# Altium PCB MeadowMinimum.PcbDoc
Units mil, origin at the board's own origin, x right, y up, seen from the top; angles counter-clockwise.
Board outline 2086.61 x 3070.87 mil, 4 copper layers (1:Top Layer, 2:Power, 3:GND, 4:Bottom Layer), stack 62.36 mil thick; 107 components, 134 nets, 497 pads, 224 vias.
Unrouted connection lines stored in the file: 1.
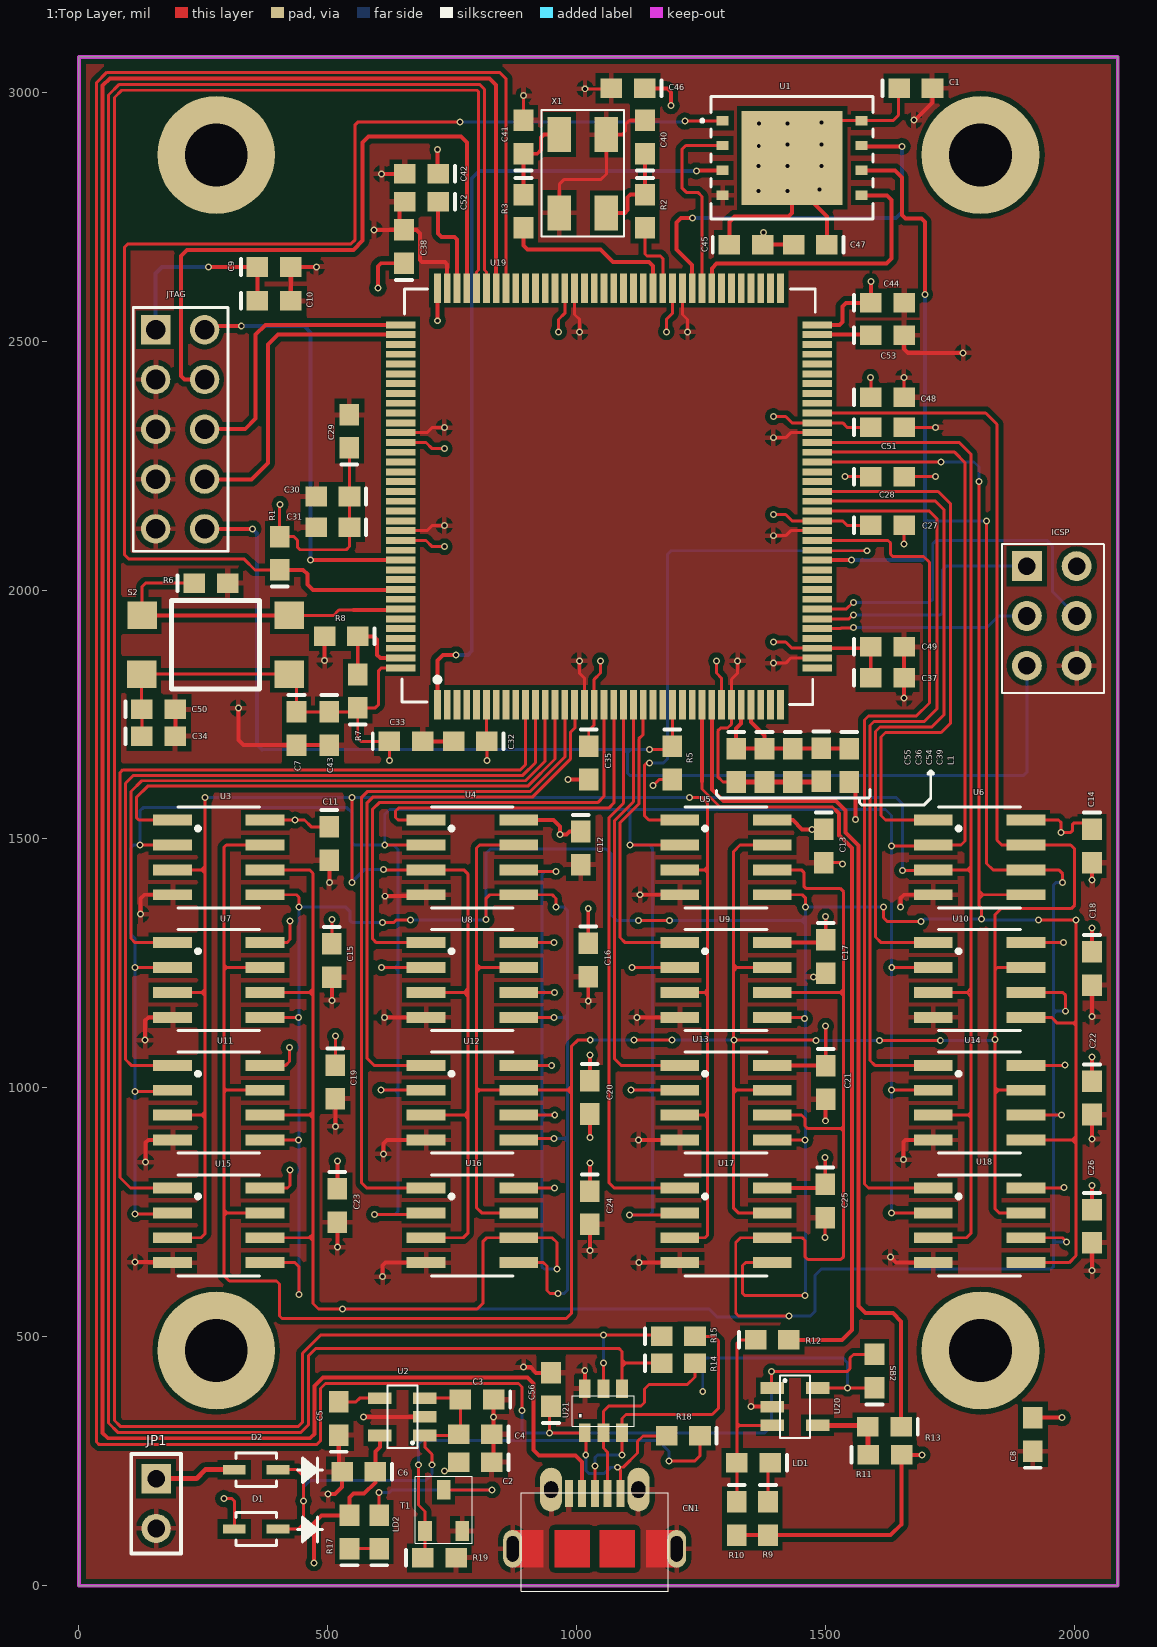
[diagram p0: 1:Top Layer view]
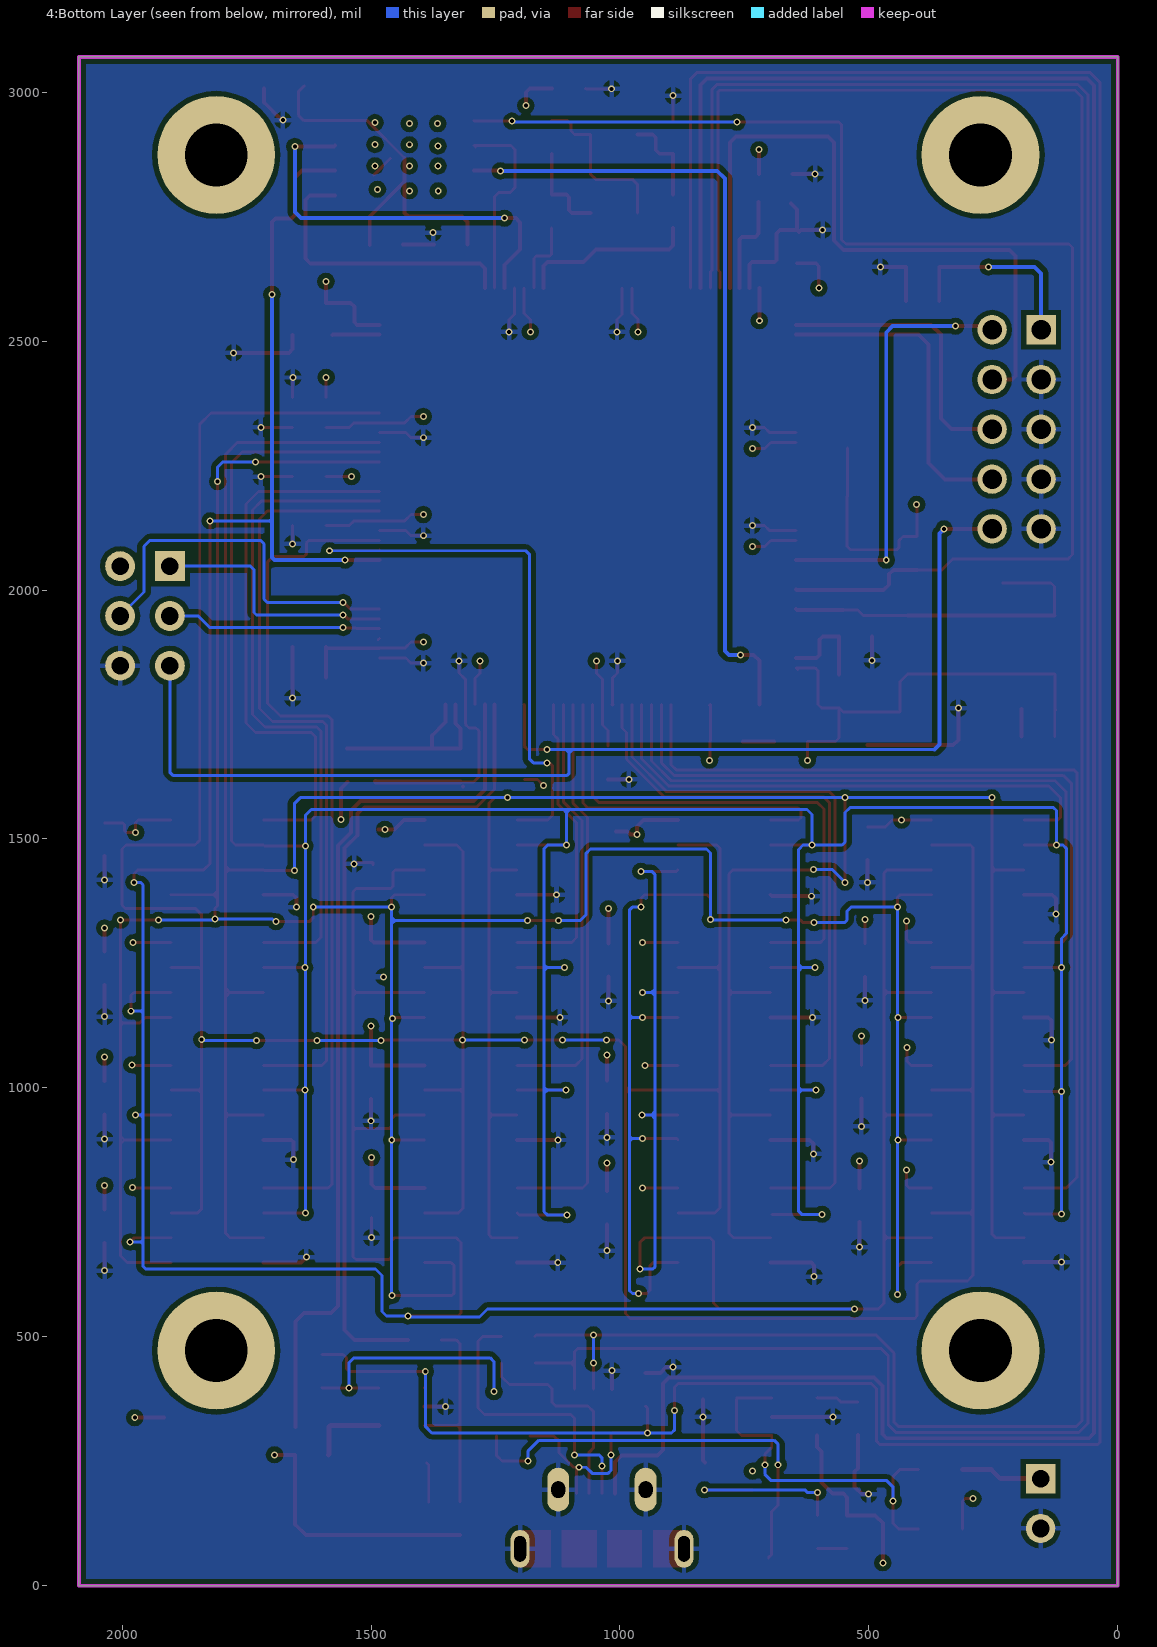
[diagram p1: 4:Bottom Layer view, seen from below]
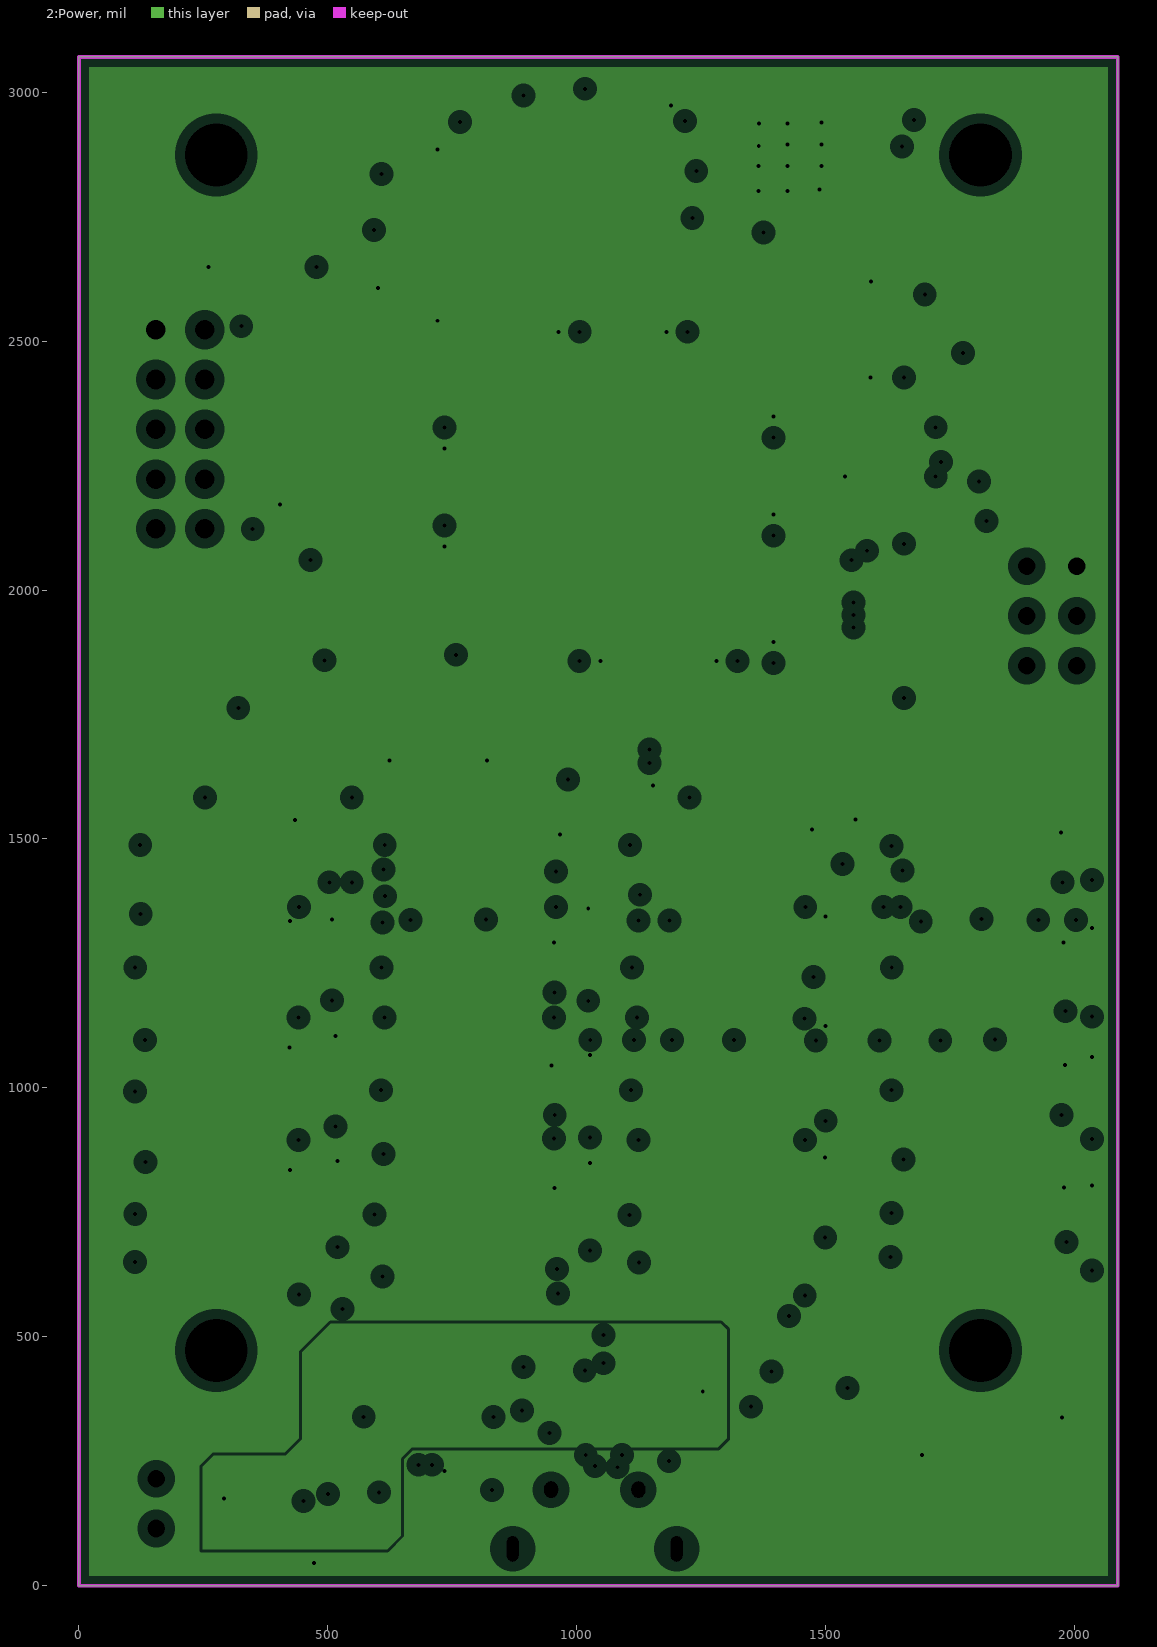
[diagram p2: 2:Power, clearances drawn from the general rule]
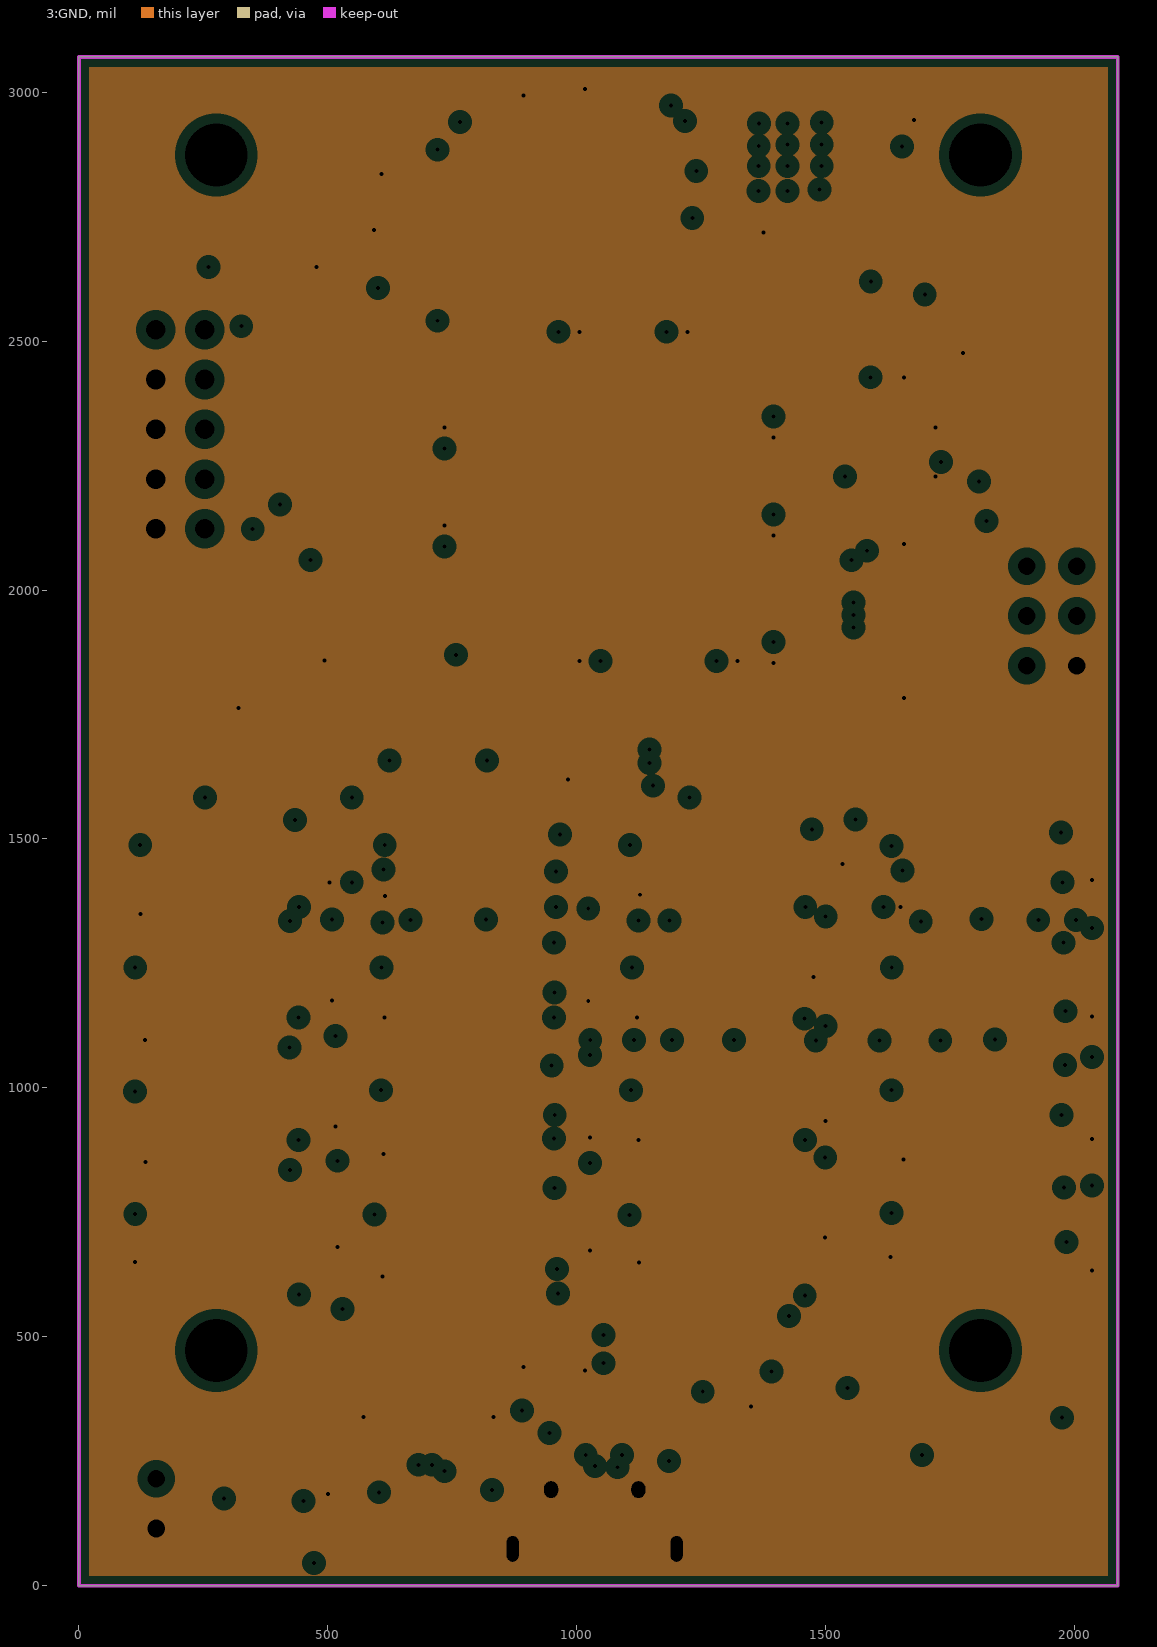
[diagram p3: 3:GND, clearances drawn from the general rule]

## Layer stack, top to bottom
Top Solder: solder mask 0.4, Solder Resist, Dk 3.5
1:Top Layer: signal copper 1.4169
Dielectric 1: core 18.8976, FR-4, Dk 4.2
2:Power: plane copper 1.4169, net (Multiple Nets)
Dielectric 2: prepreg 18.8976, FR-4, Dk 4.2
3:GND: plane copper 1.4169, net GND
Dielectric 3: core 18.8976, FR-4, Dk 4.2
4:Bottom Layer: signal copper 1.4169
Bottom Solder: solder mask 0.4, Solder Resist, Dk 3.5

## Board outline
0,0 2086.61,0 2086.61,3070.87 0,3070.87

## Design rules (kind name [scope] priority, off if disabled: settings)
Clearance Clearance_1 [All vs inpoly] p1: gap=10
Clearance [All] p2: gap=5
ComponentClearance [All] p1: gap=6 collisioncheckmode=3 verticalgap=6 showdistances=FALSE
DiffPairsRouting [All] p1: maxlimit=6 minlimit=6 mostfreqgap=6 toplayer_minwidth=6 toplayer_maxwidth=6 toplayer_prefwidth=6 bottomlayer_minwidth=6 bottomlayer_maxwidth=6 bottomlayer_prefwidth=6 maxuncoupledlength=500
HoleSize [All] p1: absolutevalues=TRUE maxlimit=1000 minlimit=1 maxpercent=80.000 minpercent=20.000
HoleToHoleClearance [All] p1: gap=8 allowstackedmicrovias=TRUE
MinimumSolderMaskSliver [All] p1: minsoldermaskwidth=2
PlaneClearance [All] p1: clearance=20
PlaneConnect [All] p1: planeconnectstyle=Relief reliefexpansion=20 reliefentries=4 reliefconductorwidth=10 reliefairgap=10
PolygonConnect [All] p1: connectstyle=Relief reliefconductorwidth=10 reliefentries=4 polygonreliefangle="90 Angle" airgapwidth=10
RoutingVias [All] p1: holewidth=23.62 width=39.37 viastyle="Through Hole" minholewidth=8 minwidth=8 maxholewidth=50 maxwidth=50
SilkToSilkClearance [All] p1: silktosilkclearance=1
SilkToSolderMaskClearance [IsPad] p1: minsilkscreentomaskgap=0 clearancetoexposedcopper=TRUE
SolderMaskExpansion [All] p1: expansion=4
Width [All] p1: maxlimit=80 minlimit=6 preferedwidth=6
21 further rules are at their usual default settings.

## Classes and differential pairs
component class "FLASH QSPI": C1 R1 U1
component class Power: C2 C3 C4 C5 C6 C7 C8 C9 C10 D1 D2 JP1 U2
component class SRAM: C11 C12 C13 C14 C15 C16 C17 C18 C19 C20 C21 C22 C23 C24 C25 C26 U3 U4 U5 U6 U7 U8 U9 U10 U11 U12 U13 U14 U15 U16 U17 U18
component class STM32F7: C27 C28 C29 C30 C31 C32 C33 C34 C35 C36 C37 C38 C39 C40 C41 C42 C43 C44 C45 C46 C47 C48 C49 C50 C51 C52 C53 C54 C55 ICSP JTAG L1 R2 R3 R5 R6 R7 R8 S2 U19 X1
component class USB_OTG_FS: C56 CN1 LD1 LD2 R9 R10 R11 R12 R13 R14 R15 R17 R18 R19 SB2 T1 U20 U21
differential pair OTG_FS: +OTG_FS_P -OTG_FS_N
differential pair USB_FS1: +USB_FS1_P -USB_FS1_N

## Components (designator, comment, footprint, x,y, rotation, side; value= is the part's Value field where it differs from the comment)
C1 "100nF" 0603 1681,3008 r0 top
C2 "100nF" 0603 796,248 r180 top
C3 "1uF" 0603 799.45,374 r180 top
C4 "100nF" 0603 796,304 r180 top
C5 "10nF" 0603 522,336 r90 top
C6 "1uF" 0603 562,229 r180 top
C7 "100nF" 0603 437,1722 r270 top
C8 "100nF" 0603 1916,304 r90 top
C9 "100nF" 0603 392,2649 r0 top
C10 "100nF" 0603 392,2581 r0 top
C11 "100nF" 0603 502.84,1491 r270 top
C12 "100nF" 0603 1008,1481.62 r270 top
C13 "100nF" 0603 1496,1486 r270 top
C14 "100nF" 0603 2035,1486 r270 top
C15 "100nF" 0603 508,1256 r270 top
C16 "100nF" 0603 1023,1257 r270 top
C17 "100nF" 0603 1500,1264 r270 top
C18 "100nF" 0603 2035,1240 r270 top
C19 "100nF" 0603 515,1012 r270 top
C20 "100nF" 0603 1026.25,981 r270 top
C21 "100nF" 0603 1500,1011 r270 top
C22 "100nF" 0603 2035,980 r270 top
C23 "100nF" 0603 519,764 r270 top
C24 "100nF" 0603 1026.25,759.26 r270 top
C25 "100nF" 0603 1499,773 r270 top
C26 "100nF" 0603 2035,722 r270 top
C27 "100nF" 0603 1624,2130 r0 top
C28 "100nF" 0603 1624,2228 r0 top
C29 "100nF" 0603 543,2319 r90 top
C30 "100nF" 0603 510,2188 r180 top
C31 "100nF" 0603 510,2126 r180 top
C32 "100nF" 0603 786,1696 r180 top
C33 "100nF" 0603 657,1696 r0 top
C34 "100nF" 0603 160,1706 r0 top
C35 "100nF" 0603 1024,1653 r270 top
C36 "100nF" 0603 1377,1648 r270 top
C37 "4.7uF" 0603 1624,1824 r0 top
C38 "4.7uF" 0603 653,2690 r90 top
C39 "1uF" 0603 1491,1649.17 r270 top
C40 "4.7pF" 0603 1137,2910 r90 top
C41 "4.7pF" 0603 893,2910 r90 top
C42 "100nF" 0603 688,2836 r180 top
C43 "100nF" 0603 503,1722 r270 top
C44 "100nF" 0603 1624,2577 r0 top
C45 "100nF" 0603 1340,2694 r0 top
C46 "100nF" 0603 1103,3008 r180 top
C47 "100nF" 0603 1469,2694 r180 top
C48 "100nF" 0603 1624,2387 r0 top
C49 "100nF" 0603 1624,1886 r0 top
C50 "100nF" 0603 160,1761 r0 top
C51 "100nF" 0603 1624,2327 r0 top
C52 "2.2uF" 0603 688,2780 r180 top
C53 "2.2uF" 0603 1624,2512 r0 top
C54 "100nF" 0603 1434,1648 r270 top
C55 "1uF" 0603 1320,1648 r270 top
C56 "4.7uF" 0603 948.25,394 r90 top
CN1 "USB-MICRO-AB" "USB-MICRO-AB, 47590-0001, SMT, MOLEX" 984.25,185 r0 top
D1 "BAT60JFILM" BAT60JFILM 438,85 r0 top
D2 "BAT60JFILM" BAT60JFILM 438,204 r0 top
ICSP "Header3x2" "6 pin Header" 1904,2048 r0 top
JP1 "Header 2" HDR1X2 155,215 r270 top
JTAG "Header 5X2" "10 Pin Header" 154,2523 r0 top
L1 "BLM18EG601SN1D" 0603 1547,1648 r270 top
LD1 "LED, red" 0603 1355,247 r180 top
LD2 "LED, white" 0603 603,108 r90 top
R1 "10K" 0603 403,2074 r90 top
R2 "0" 0603 1137,2761 r270 top
R3 "0" 0603 893,2761 r270 top
R5 "10K" 0603 1192,1653 r270 top
R6 "10K" 0603 265,2014 r0 top
R7 "10K" 0603 560,1797 r90 top
R8 "[NA]" 0603 526.96,1907 r180 top
R9 "620" 0603 1384,135 r270 top
R10 "47K" 0603 1321,135 r270 top
R11 "10K" 0603 1619,263 r0 top
R12 "0" 0603 1392.67,494 r0 top
R13 "0" 0603 1618,319 r180 top
R14 "0" 0603 1204,447 r0 top
R15 "0" 0603 1204,501 r0 top
R17 "330" 0603 543.46,108 r90 top
R18 "47K" 0603 1214,301 r180 top
R19 "100K" 0603 724,56 r0 top
S2 "Switch(TSXH-2GL)" Switch 127,1831 r0 top
SB2 "Solder Bridge ON" 0603 1598,431.25 r90 top
T1 "PBSS8110T" "CMBT 9013" 695.1,110 r0 top
U1 "N25Q256A13EF840E" N25Q256A13EF840E 1293,2943 r0 top
U2 "LD3985M33R" LD3985M33R 695,302 r90 top
U3 "23A1024" 23A1024 188,1538 r0 top
U4 "23A1024" 23A1024 697.33,1538 r0 top
U5 "23A1024" 23A1024 1206.67,1538 r0 top
U6 "23A1024" 23A1024 1716,1538 r0 top
U7 "23A1024" 23A1024 188,1291.67 r0 top
U8 "23A1024" 23A1024 697.33,1291.67 r0 top
U9 "23A1024" 23A1024 1206.67,1291.67 r0 top
U10 "23A1024" 23A1024 1716,1291.67 r0 top
U11 "23A1024" 23A1024 188,1045.33 r0 top
U12 "23A1024" 23A1024 697.33,1045.33 r0 top
U13 "23A1024" 23A1024 1206.67,1045.33 r0 top
U14 "23A1024" 23A1024 1716,1045.33 r0 top
U15 "23A1024" 23A1024 188,799 r0 top
U16 "23A1024" 23A1024 697.33,799 r0 top
U17 "23A1024" 23A1024 1206.67,799 r0 top
U18 "23A1024" 23A1024 1716,799 r0 top
U19 "STM32F77XZXT" STM32F777ZI 720,1770 r0 top
U20 "STMPS2141STR" STMPS2141STR 1393,397 r270 top
U21 "STF202-22T1GOSCT-ND" SOT-457 1016,307 r0 top
X1 "ABM3B-25MHZ D2Y-T" "25MHZ ABM3B-25MHZ D2Y-T" 965,2915 r270 top

## Footprints (in the part's own frame and the unit in brackets; to place one, negate y for a bottom-side part, rotate by r counter-clockwise, add the part's x,y. Pads: shape width x height; smd on the part's side, far side on the other; paste and mask are expansions set on the pad)
"6 pin Header" [mil] "Header3x2"
  rect 60x60 hole 35.43: 1(0,0)
  round 60 hole 35.43: 2(100,0) 3(0,-100) 4(100,-100) 5(0,-200) 6(100,-200)
  silkscreen extent -50,-255 155,45, body extent -49,-251 148,49, height 295
"10 Pin Header" [mm] "Header5x2"
  rect 1.5x1.5 hole 1: 1(0,0)
  round 1.5 hole 1: 2(2.5,0) 3(0,-2.54) 4(2.5,-2.54) 5(0,-5.08) 6(2.5,-5.08) 7(0,-7.62) 8(2.5,-7.62) 9(0,-10.16) 10(2.5,-10.16)
  silkscreen extent -1.14,-11.3 3.68,1.14, body extent -1.32,-11.3 3.68,1.4, height 8
23A1024 [mil]
  rect 78x22 smd: 1(0,0) 2(0,-50) 3(0,-100) 4(0,-150) 5(186,-150) 6(186,-100) 7(186,-50) 8(186,0)
  silkscreen extent 11,-176 175,26, body extent -25,-171 211,22, height 69
"25MHZ ABM3B-25MHZ D2Y-T" [mm] "535-13452-1-ND"
  rect 1.8x1.2 smd: 1(0,0) 2(4,0) 3(4,2.4) 4(0,2.4)
  silkscreen extent -1.24,-0.91 5.21,3.3, body extent -0.49,-0.37 4.51,2.81, height 1.1
0603 [mm] "Chip Capacitor; Body 1.6 x 0.8 mm (LxW typ)"
  rect 1.1x1 smd: 1(-0.85,0) 2(0.85,0)
  silkscreen extent -1.7,-0.4 -1.7,0.4
BAT60JFILM [mil] "497-3707-1-ND"
  rect 46x19 smd: 1(-126,29) 2(-38,29)
  silkscreen extent -122,-4 51,62, body extent -135,0 -29,57, height 46
"CMBT 9013" [mm]
  rect 0.7x1 smd: 1(0,0) 2(1.9,0) 3(0.95,2.1)
  silkscreen extent -0.51,-0.64 2.41,2.79, body extent 0,0 1.9,2.03, height 0.95
HDR1X2 [mm] "Connector; Header; 2 Position"
  rect 1.5x1.5 hole 0.9: 1(0,0)
  round 1.5 hole 0.9: 2(2.54,0)
  silkscreen extent -1.27,-1.27 3.81,1.27
LD3985M33R [mm] "497-3504-1-ND"
  rect 0.6x1.2 smd: 1(0,0) 2(0.95,0) 3(1.9,0) 4(1.9,2.3) 5(0,2.3)
  silkscreen extent -0.64,0.38 2.54,1.91, body extent -0.64,0.38 2.54,1.91, height 1.45
N25Q256A13EF840E [mil]
  rect 24x19 smd: 1(0,0) 2(0,-50) 3(0,-100) 4(0,-150) 5(279,-150) 6(279,-100) 7(279,-50) 8(279,0)
  rect 203x189 smd paste-101: 9(139.5,-75)
  silkscreen extent -44,-198 302,48, body extent -19,-193 300,43, height 39
SOT-457 [mm]
  rect 0.6x0.95 smd: 1(0,0) 2(0.95,0) 3(1.9,0) 4(1.9,2.25) 5(0.95,2.25) 6(0,2.25)
  silkscreen extent -0.64,0.33 2.51,1.91
STM32F777ZI [mm]
  rect 0.35x1.5 smd: 1(0,0) 2(0.5,0) 3(1,0) 4(1.5,0) 5(2,0) 6(2.5,0) 7(3,0) 8(3.5,0) 9(4,0) 10(4.5,0) 11(5,0) 12(5.5,0) 13(6,0) 14(6.5,0) 15(7,0) 16(7.5,0) 17(8,0) 18(8.5,0) 19(9,0) 20(9.5,0) 21(10,0) 22(10.5,0) 23(11,0) 24(11.5,0) 25(12,0) 26(12.5,0) 27(13,0) 28(13.5,0) 29(14,0) 30(14.5,0) 31(15,0) 32(15.5,0) 33(16,0) 34(16.5,0) 35(17,0) 36(17.5,0) 73(17.5,21.25) 74(17,21.25) 75(16.5,21.25) 76(16,21.25) 77(15.5,21.25) 78(15,21.25) 79(14.5,21.25) 80(14,21.25) 81(13.5,21.25) 82(13,21.25) 83(12.5,21.25) 84(12,21.25) 85(11.5,21.25) 86(11,21.25) 87(10.5,21.25) 88(10,21.25) 89(9.5,21.25) 90(9,21.25) 91(8.5,21.25) 92(8,21.25) 93(7.5,21.25) 94(7,21.25) 95(6.5,21.25) 96(6,21.25) 97(5.5,21.25) 98(5,21.25) 99(4.5,21.25) 100(4,21.25) 101(3.5,21.25) 102(3,21.25) 103(2.5,21.25) 104(2,21.25) 105(1.5,21.25) 106(1,21.25) 107(0.5,21.25) 108(0,21.25)
  rect 1.5x0.35 smd: 37(19.375,1.875) 38(19.375,2.375) 39(19.375,2.875) 40(19.375,3.375) 41(19.375,3.875) 42(19.375,4.375) 43(19.375,4.875) 44(19.375,5.375) 45(19.375,5.875) 46(19.375,6.375) 47(19.375,6.875) 48(19.375,7.375) 49(19.375,7.875) 50(19.375,8.375) 51(19.375,8.875) 52(19.375,9.375) 53(19.375,9.875) 54(19.375,10.375) 55(19.375,10.875) 56(19.375,11.375) 57(19.375,11.875) 58(19.375,12.375) 59(19.375,12.875) 60(19.375,13.375) 61(19.375,13.875) 62(19.375,14.375) 63(19.375,14.875) 64(19.375,15.375) 65(19.375,15.875) 66(19.375,16.375) 67(19.375,16.875) 68(19.375,17.375) 69(19.375,17.875) 70(19.375,18.375) 71(19.375,18.875) 72(19.375,19.375) 109(-1.875,19.375) 110(-1.875,18.875) 111(-1.875,18.375) 112(-1.875,17.875) 113(-1.875,17.375) 114(-1.875,16.875) 115(-1.875,16.375) 116(-1.875,15.875) 117(-1.875,15.375) 118(-1.875,14.875) 119(-1.875,14.375) 120(-1.875,13.875) 121(-1.875,13.375) 122(-1.875,12.875) 123(-1.875,12.375) 124(-1.875,11.875) 125(-1.875,11.375) 126(-1.875,10.875) 127(-1.875,10.375) 128(-1.875,9.875) 129(-1.875,9.375) 130(-1.875,8.875) 131(-1.875,8.375) 132(-1.875,7.875) 133(-1.875,7.375) 134(-1.875,6.875) 135(-1.875,6.375) 136(-1.875,5.875) 137(-1.875,5.375) 138(-1.875,4.875) 139(-1.875,4.375) 140(-1.875,3.875) 141(-1.875,3.375) 142(-1.875,2.875) 143(-1.875,2.375) 144(-1.875,1.875)
  silkscreen extent -1.8,0 19.28,21.21, body extent -1.91,0 19.3,21.34, height 1.6
STMPS2141STR [mm] "497-6933-2-ND"
  rect 0.6x1.2 smd: 1(0,0) 2(0.95,0) 3(1.9,0) 4(1.9,2.3) 5(0,2.3)
  silkscreen extent -0.64,0.38 2.54,1.91, body extent -0.64,0.38 2.54,1.91, height 1.45
Switch [mm] "SPST"
  rect 1.5x1.4 smd: 1(0,3) 1(7.5,3) 2(-0.025,0) 2(7.5,0)
  silkscreen extent 1.5,-0.75 5.97,3.75, body extent 1.5,-0.75 5.97,3.75, height 3.4
"USB-MICRO-AB, 47590-0001, SMT, MOLEX" [mil] "WM17144TR-ND"
  rect 16x54 smd: 1(103.18,0) 2(77.59,0) 3(52,0) 4(26,0) 5(0,0)
  oval 38x76 hole 24 slot 51.18 at 90 deg: 6(-113,-111) 6(216.37,-111)
  oval 44x88 hole 28 slot 33.46 at 90 deg: 6(-36,8) 6(139.6,8)
  1:Top Layer region: 42,-148.4 42,-73 -29,-73 -29,-148.4
  1:Top Layer region: -51,-148.4 -51,-73 -113,-73 -113,-148.4
  1:Top Layer region: 61.84,-73 61.84,-148.4 132.7,-148.4 132.7,-73
  1:Top Layer region: 154.36,-73 154.36,-148.4 216.37,-148.4 216.37,-73
  silkscreen extent -96,-196 200,2, body extent -118,-219 222,13, height 115

## Part data
C1 C2 C4 C7 C8 C9 C10 C11 C12 C13 C14 C15 C16 C17 C18 C19 C20 C21 C22 C23 C24 C25 C26 C27 C28 C29 C30 C31 C32 C33 C34 C35 C36 C42 C43 C44 C45 C46 C47 C48 C49 C50 C51 C54: library part Cap_100nF_X7R_10%_0402, "0201"
C3 C6: library part Cap_1uF_X5R_10%_0603, "0201"
C5: library part Cap_10nF_X7R_10%_0603, "0201"
C37 C38: library part Cap_4.7uF_POL_10%_TANA, "0201"
C39 C55: library part Cap_1uF_POL_10%_TANA, "0201"
C40 C41: library part Cap_4.7pF_NPO_-+0.25pF_0402, "0201"
C52 C53: library part Cap_2.2uF_X7R_10%_1206, "0201"
C56: library part Cap_4.7uF_X5R_10%_0603, "0201"
CN1: "USB-MICRO-AB, 47590-0001, SMT, MOLEX"
ICSP: library part "6 pin Header"
JP1: "Header, 2-Pin"
JTAG: "Header, 5-Pin, Dual row"
L1: library part BEAD_600R_350MA_0603, "Bead,600R,350mA,0603,FCM1608KF-601T03,Tai-tech"
LD1: library part LED_red, "LED, red, 0603"
LD2: library part LED_green, "LED, green, 0603"
R1 R5 R6 R7 R11: library part Res_10K_1%_0402, "0201"
R2 R3 R12 R13 R14 R15: library part Res_0_5%_0402, "0201"
R8: library part Res_NA_0402, "0201"
R9: library part Res_620_1%_0603, "0201"
R10 R18: library part Res_47K_1%_0402, "0201"
R17: library part Res_330_1%_0603, "0201"
R19: library part Res_100K_1%_0402, "0201"
SB2: library part SB_ON
T1: library part 9013-SOT23, "NPN Bipolar Transistor"
U2: "Ultra low drop-low noise BiCMOS voltage, regulators low ESR capacitors compatible"
U3 U4 U5 U6 U7 U8 U9 U10 U11 U12 U13 U14 U15 U16 U17 U18: "1MB 1.8V 1MB QSPI SRAM    MOUSER PART # 579-23A1024-I/SN"
U19: "Imported"
U20: "Enhanced single channel power switches"
X1: "25MHz Crystal"

## Free pads (board coordinates)
  round 236.22 hole 125.98: 0(275.59,472.44) 0(275.59,2874.02) 0(1811.02,2874.02) 1(1811.02,472.44)

## Via types
v1: diameter 14, hole 8, 1:Top Layer to 4:Bottom Layer, 224 vias

## Nets (pads, with @x,y where several pads share a name; then routed paths per layer and width w, separated by ;. In a path a pad name is that pad's centre, name@x,y a point inside that pad or via, vN(x,y) a via of type N, cw(c..) or ccw(c..) an arc to the next point about the centre after c; other vN are vias at no path point)
3V3: C1.1 C2.2 C6.1 C7.1 C8.2 C9.1 C10.1 C11.1 C12.1 C13.1 C14.1 C15.1 C16.1 C17.1 C18.1 C19.1 C20.1 C21.1 C22.1 C23.1 C24.1 C25.1 C26.1 C27.1 C28.1 C29.1 C30.1 C31.1 C32.1 C33.1 C34.1 C35.1 C37.1 C38.1 C42.1 C43.1 C44.1 C45.1 C46.1 C47.1 C48.1 C49.1 C50.1 C51.1 ICSP.2 JTAG.1 L1.2 R1.2 R5.2 R7.1 R9.2 R10.2 R11.2 R17.2 S2.2 U1.8 U1.9 U2.5 U3.8 U4.8 U5.8 U6.8 U7.8 U8.8 U9.8 U10.8 U11.8 U12.8 U13.8 U14.8 U15.8 U16.8 U17.8 U18.8 U19.6 U19.17 U19.30 U19.39 U19.52 U19.62 U19.72 U19.84 U19.95 U19.108 U19.121 U19.131 U19.144 | length 7877.5
  1:Top Layer w6: C50.1@124,1759.54 126,1761.54 126,1831 422.28,1831 437,1816.28 C7.1 C43.1 551.93,1755.46 R7.1 ; C34.1 C50.1 ; U15.8 419,799 423.9,803.9 v1(423.9,835) ; U11.8 415.33,1045.33 423,1053 v1(423,1081) ; U7.8 417.67,1291.67 424,1298 v1@424,1335 ; U3.8 v1(434,1538) 453,1538 466.54,1524.46 C11.1 ; v1@403,2172.25 R1.2 431.54,2107.46 439,2100 439,2086 444,2081 537,2081 543.46,2087.46 C31.1 C30.1 543,2188.46 C29.1 ; C15.1 v1(508,1338) ; C19.1 v1(515,1104) ; v1(623.54,1658) C33.1 567,1696 560,1703 R7.1 ; U19.144@642.4,1840.04 U19.144 607.86,1843.82 602.04,1838 602.04,1770.31 595.27,1763.54 R7.1 ; U19.131 696.92,2099.72 709.44,2087.2 v1@733.44,2087.2 ; U19.121 696.92,2296.57 709.44,2284.06 v1(733.98,2284.06) ; U19.6@819.96,1768.46 U19.6 818.43,1697.04 C32.1 819.46,1658.54 v1(820,1658) ; U16.8 v1(955,799) ; U12.8 v1(949.67,1045.33) ; U8.8 v1(954.57,1291.67) ; v1@963.39,2519.35 963.39,2543.35 975.91,2555.87 U19.95 ; C35.1 1024,1718 1034.96,1728.96 U19.17 1034.96,1820.74 1047.48,1833.26 v1@1047.48,1857.26 ; v1(1153.07,1607) 1165.61,1619.54 R5.2 ; v1@1179.92,2519.35 1179.92,2543.35 1192.44,2555.87 U19.84 ; v1@1280.61,1857.26 1280.61,1833.26 1290.87,1823 U19.30 ; v1@1395.54,1895.71 1419.54,1895.71 1432.06,1883.19 U19.39 ; v1@1395.54,2151.61 1419.54,2151.61 1432.06,2139.09 U19.52 1533.91,2139.09 1543,2130 C27.1 ; v1@1395.54,2348.46 1419.54,2348.46 1432.06,2335.94 U19.62 1534.06,2335.94 1543,2327 C51.1 ; U1.9 1507.5,2943 U1.8 1635,2943 1646,2954 1646,3001 C1.1@1634,3013 ; U1.9@1461.19,2867 U1.9@1494.73,2833.46 ; v1(1539,2228) C28.1 ; C48.1 v1@1590.54,2427.46 ; U18.8 v1@1979,799 ; U14.8 v1@1980.33,1045.33 ; U10.8 v1(1977.67,1291.67) ; U6.8 1967.74,1538 1973,1532.74 v1(1973,1513) 1992,1513 1995.33,1516.33 1995.33,1528.61 1999.19,1532.46 C14.1@2035,1532.46
  1:Top Layer w7.87: v1(260,2649) C9.1 C10.1 ; v1(600.55,2606.61) 600.55,2650.55 606.54,2656.54 C38.1@644.29,2656.54 ; C42.1@720.46,2836 v1(720.46,2884.54) ; U17.8 1491.54,799 C25.1 v1(1499,860) ; U13.8 1499.13,1045.33 C21.1 v1(1500,1124) ; U9.8 1494.2,1291.67 C17.1 v1(1500,1344) ; U5.8 1434,1538 1452.54,1519.46 C13.1@1485,1519.46 ; U1.9@1432.5,2820.5 1502.46,2750.54 C47.1@1502.46,2693 ; U19.39 1587.72,1883.19 C49.1 C37.1 ; L1.2 1560,1601.54 v1(1560,1539) ; C26.1 v1(2035,804) ; C22.1 v1(2035,1062) ; C18.1 v1(2035,1321)
  1:Top Layer w8: v1(472,46) 472,126 487.46,141.46 R17.2 543.46,177.46 551,185 573,185 595.46,207.46 C6.1 595.46,269.95 604.45,278.94 U2.5 ; C23.1 v1(519,853.59) ; v1(720,2541) U19.108 ; U4.8 953,1538 966,1525 v1(966,1509) 979,1509 985.08,1515.08 C12.1 ; C16.1 v1(1023,1360) ; C24.1 v1(1026.25,849) ; C20.1 v1(1026.25,1065.75) ; C46.1 1181,3008 1189,3000 v1(1189,2973) ; C45.1 1306.54,2739.54 1317,2750 1425,2750 1432.5,2757.5 1432.5,2820.5 U1.9 ; R10.2 R9.2 1630.54,101.54 1652.46,123.46 R11.2 v1(1693.75,263) ; U19.72 1527.8,2532.8 1533.46,2538.46 1533.46,2569.46 1541,2577 C44.1 v1(1590.54,2620) ; C8.2 v1(1974.54,337.46)
  4:Bottom Layer w7.87: JTAG.1 154,2636 167,2649 v1(260,2649)
  other v1: 733.98,230 1979.04,799.96 1980.37,1046.29 423.9,1334.9 1472,1519.46 1047.48,1857.8 1280.61,1857.8 1395,1895.71 733.98,2087.2 1395,2151.61 404,2172 1395,2348.46 1590,2427.46 963.39,2518.82 1179.92,2518.82 1364.91,2802 1423,2802 1487.19,2805 1365.46,2852 1423,2852 1492,2852 1365.5,2892 1423,2894.56 1492,2895 1366,2937 1423,2937 1492,2939
5V: D1.1 SB2.1 U20.5 | length 603.3
  1:Top Layer w6: v1(291,175) 307,175 312,170 D1.1 ; U20.5 v1(1544,397) 1597.21,397 SB2.1
  4:Bottom Layer w6: v1(1253,389.75) 1253,450 1260.72,457.72 1534.28,457.72 1544,448 v1(1544,397)
BOOT0: R6.1 S2.1 U19.138 | length 689.8
  1:Top Layer w6: S2.1@127,1949.11 127,2007 134,2014 R6.1 ; S2.1@422.28,1949.11 511.11,1949.11 522.04,1960.04 551,1960.04
  1:Top Layer w8: S2.1@127,1949.11 S2.1@422.28,1949.11 ; 551,1960.04 644.29,1960.04 U19.138
CS_RAM_1: U3.1 U19.13 | length 1097.4
  1:Top Layer w6: U3.1 120.3,1538 115.31,1542.98 115.31,1583.31 138,1606 901.56,1606 956.22,1660.66 U19.13
CS_RAM_2: U4.1 U19.19 | length 719
  1:Top Layer w6: U4.1 641.33,1538 636,1543.33 636,1556 642,1562 1064,1562 1074.33,1572.33 U19.19
CS_RAM_3: U5.1 U19.49 | length 1143
  1:Top Layer w6: v1(1146,1653) 1141.59,1653 1141.29,1653.29 1135.7,1647.7 1135.7,1547 1144.7,1538 U5.1 ; U19.49 1483.83,2079 v1(1583,2079)
  4:Bottom Layer w6: v1(1146,1653) 1174,1653 1182,1661 1182,2072 1189,2079 v1(1583,2079)
CS_RAM_4: U6.1 U19.55 | length 1136.9
  1:Top Layer w6: U19.55 1725.84,2198.15 1751,2172.99 1751,1733 1732,1714 1620,1714 1611,1705 1611,1547 1620,1538 U6.1
CS_RAM_5: U7.1 U19.12 | length 1353.5
  1:Top Layer w6: U7.1 112.65,1291.67 104.31,1300 104.31,1595.31 126,1617 897,1617 936.54,1656.54 U19.12
CS_RAM_6: U8.1 U19.18 | length 1031
  1:Top Layer w6: U8.1 597.33,1291.67 590,1299 590,1560 603,1573 1042,1573 1054.65,1585.65 U19.18
CS_RAM_7: U9.1 U19.22 | length 611.2
  1:Top Layer w6: U19.22 1133.39,1710 1124.7,1701.31 1124.7,1570.44 1087,1532.74 1087,1302 1097.33,1291.67 U9.1
CS_RAM_8: U10.1 U19.54 | length 1359.1
  1:Top Layer w6: U19.54 1720.36,2178.46 1738,2160.82 1738,1750 1713,1725 1609,1725 1600,1716 1600,1303 1611.33,1291.67 U10.1
CS_RAM_9: U11.1 U19.11 | length 1611.7
  1:Top Layer w6: U11.1 104.98,1045.33 93.31,1057 93.31,1611.76 109.56,1628 891.56,1628 916.85,1653.29 U19.11
CS_RAM_10: U12.1 U19.15 | length 1195.7
  1:Top Layer w6: U12.1 592.67,1045.33 579,1059 579,1573 590,1584 910.67,1584 986.91,1660.24 986.91,1713.91 996,1723 996,1769.59 U19.15
CS_RAM_11: U13.1 U19.21 | length 863.5
  1:Top Layer w6: U19.21 1113.7,1575 1076,1537.3 1076,1106 1076,1058 1088.67,1045.33 U13.1
CS_RAM_12: U14.1 U19.53 | length 1581.8
  1:Top Layer w6: U19.53 1708.22,2158.78 1724,2143 1724,1762 1698,1736 1597,1736 1589,1728 1589,1055 1598.67,1045.33 U14.1
CS_RAM_13: U15.1 U19.10 | length 1869.9
  1:Top Layer w6: U15.1 103.31,799 82.31,820 82.31,1633.31 88,1639 887,1639 897.17,1649.17 U19.10
CS_RAM_14: U16.1 U19.14 | length 1455.1
  1:Top Layer w6: U16.1 578,799 568,809 568,1584 579,1595 906.11,1595 975.91,1664.79 U19.14
CS_RAM_15: U17.1 U19.20 | length 1118.8
  1:Top Layer w6: U19.20 1094.02,1572 1065,1542.98 1065,809 1075,799 U17.1
CS_RAM_16: U18.1 U19.50 | length 1757.6
  1:Top Layer w6: U19.50 1625.28,2099.72 1630,2095 1630,2072 1634.44,2067.56 1696.52,2067.56 1708.39,2055.69 1708.39,1773.39 1682,1747 1586,1747 1578,1739 1578,807 1586,799 U18.1
E5V: D2.1 JP1.1 | length 180
  1:Top Layer w10: JP1.1 236,215 254,233 D2.1
  4:Bottom Layer w10: JP1.1 JP1.1@166,226
GND: C1.2 C2.1 C3.1 C4.1 C5.1 C6.2 C7.2 C8.1 C9.2 C10.2 C11.2 C12.2 C13.2 C14.2 C15.2 C16.2 C17.2 C18.2 C19.2 C20.2 C21.2 C22.2 C23.2 C24.2 C25.2 C26.2 C27.2 C28.2 C29.2 C30.2 C31.2 C32.2 C33.2 C34.2 C35.2 C36.2 C37.2 C38.2 C39.2 C40.2 C41.2 C42.2 C43.2 C44.2 C45.2 C46.2 C47.2 C48.2 C49.2 C50.2 C51.2 C52.2 C53.2 C54.2 C55.2 C56.2 CN1.5 CN1.6 ICSP.6 JP1.2 JTAG.3 JTAG.5 JTAG.7 JTAG.9 R6.2 R8.2 R19.2 T1.2 U1.4 U2.2 U3.4 U4.4 U5.4 U6.4 U7.4 U8.4 U9.4 U10.4 U11.4 U12.4 U13.4 U14.4 U15.4 U16.4 U17.4 U18.4 U19.16 U19.31 U19.38 U19.51 U19.61 U19.83 U19.94 U19.107 U19.120 U19.130 U20.2 U21.6 X1.2 X1.4 | length 5748.8
  1:Top Layer w6: U19.130 699.18,2119.41 709.44,2129.67 v1@733.44,2129.67 ; U19.120 699.18,2316.26 709.44,2326.52 v1@733.44,2326.52 ; C41.2 v1(893,2993.31) ; X1.2 965,2815 975,2825 1048.54,2825 1059.49,2835.95 X1.4 1091,2915 1098,2922 1098,2935.96 1105.5,2943.46 C40.2 ; U19.94 995.59,2553.61 1005.85,2543.35 v1@1005.85,2519.35 ; v1@1005.02,1857.26 1005.02,1833.26 1015.28,1823 U19.16 ; v1(1016.46,3007) 1068.54,3007 C46.2 ; U19.83 1212.13,2553.61 1222.39,2543.35 v1@1222.39,2519.35 ; C55.2 1293.46,1614.54 1283.18,1624.82 1283.18,1717.18 1288.93,1722.93 1302.93,1722.93 1310.55,1730.55 U19.31 1310.55,1820.74 1323.07,1833.26 v1@1323.07,1857.26 ; v1@1395.54,1853.24 1419.54,1853.24 1429.8,1863.5 U19.38 ; v1@1395.54,2109.15 1419.54,2109.15 1429.8,2119.41 U19.51 ; v1@1395.54,2306 1419.54,2306 1429.8,2316.26 U19.61 ; C13.2@1496,1448 C13.2 1531.37,1452.54 v1(1533.91,1450) ; v1(1499,699.13) C25.2 ; v1(1657.46,2093) C27.2 ; C28.2 v1@1714.46,2228 ; C51.2 v1(1721,2327) ; C48.2 v1@1657.46,2427
  1:Top Layer w8: v1(112.9,650) 188,650 U15.4 ; v1(124,1349) 124,1380 132,1388 U3.4 ; v1@133,1096 133,1135 139.67,1141.67 U7.4 ; v1@134,851 134,890.1 139.23,895.33 U11.4 ; C34.2 C50.2 ; v1(320,1763) 320,1699 330.46,1688.54 C7.2 C43.2 ; C10.2 C9.2 v1(477,2649) ; v1(493.5,1859.01) R8.2 ; v1(500.25,184) 514,184 528.54,198.54 C6.2 522,235.54 C5.1 ; v1(502.84,1413) C11.2 ; v1(508,1176) C15.2 ; v1(515,922.75) C19.2 ; v1(519,680) C23.2 ; v1(572,339.4) U2.2 ; v1(593,2723.46) 636.42,2723.46 C38.2@640.35,2719.53 ; v1(608,2836) C42.2@653.54,2836 ; v1(609.94,621) 609.94,643.57 615.37,649 U16.4 ; v1(611.39,867.61) 611.39,888 618.73,895.33 U12.4 ; v1(613.34,1141.67) U8.4 ; v1(615,1385) 694.33,1385 U4.4 ; C52.2@655.98,2776.46 644.29,2764.77 644.29,2723.46 678.06,2723.46 685,2716.53 685,2663 689,2659 735,2659 739.68,2654.31 U19.107 ; C33.2 C32.2 ; C2.1 832.91,251.45 C3.1 ; v1(893,439) 907,439 918.54,427.46 C56.2 ; v1(982,1619.54) C35.2 ; U19.16@1015,1769.72 U19.16 ; U21.6 v1(1016,432) ; v1(1023,1175) C16.2 ; v1(1026.25,673) C24.2 ; v1(1026.25,900.59) C20.2 ; v1(1120.67,1141.67) U9.4 ; v1(1124.33,895.33) U13.4 ; v1(1124.85,649) U17.4 ; v1(1127,1388) U5.4 ; C55.2@1315,1605.04 C55.2@1315.04,1605 ; v1(1350.32,359.6) U20.2 ; C45.2 C47.2 ; v1(1500,934) C21.2 ; v1(1630,660) 1641,649 U18.4 ; v1(1650,1363) 1650,1381 1657,1388 U6.4 ; v1(1656,856) 1656,891 1660.33,895.33 U14.4 ; v1(1657.46,1783) C37.2 C49.2 ; C53.2 1657.46,2484.07 1665,2476.54 v1(1776,2476.54) ; v1(1677,2944) 1679.44,2944 1714.46,2979.03 C1.2 ; v1(2035,633) C26.2 ; v1(2035,897) C22.2 ; v1(2035,1143) C18.2 ; v1(2035,1418) C14.2@2035,1465.54
  1:Top Layer w10: C55.2 C36.2 C54.2 1489.83,1614.54 C39.2
  other v1: 832.91,339 133.9,850.9 132.9,1095.9 1475.25,1223 1395,1853.24 1005.02,1857.8 1323.07,1857.8 1395,2109.15 733.98,2129.67 1721,2228 1395,2306 733.98,2326.52 1656.93,2427 1005.85,2518.82 1222.39,2518.82 1375,2718
JTCK: JTAG.6 U19.109 | length 583.6
  1:Top Layer w8: JTAG.6@250,2330 256,2324 334,2324 355,2345 355,2513 374.8,2532.8 U19.109
JTDI: JTAG.8 U19.110 | length 659.4
  1:Top Layer w8: JTAG.8@250,2230 258,2222 346.8,2222 380,2255.2 380,2493.11 400,2513.11 U19.110
JTDO: JTAG.2 U19.133 | length 859.2
  1:Top Layer w8: JTAG.2 259.43,2530 v1(326,2530) ; v1(465,2060.35) U19.133
  4:Bottom Layer w8: v1(326,2530) 452.8,2530 465,2517.8 v1(465,2060.35)
JTMS: JTAG.4 U19.105 | length 1377.5
  1:Top Layer w8: JTAG.4 212,2423 205,2430 205,2671 217,2683 551,2683 570,2702 570,2899 582,2911 767.06,2911 779.06,2899 U19.105
NetC3_2: C3.2 C4.2 D1.2 D2.2 U2.1 U2.3 | length 793.9
  1:Top Layer w6: D1.2 440,114 451,125 451,220 438,233 D2.2 ; U2.3 C3.2@765.98,376.8 ; v1@709,244.75 709,264 695,278 U2.1 756,302 765.98,311.98 C3.2
  4:Bottom Layer w6: v1(451,170) 451,198 464,211 696,211 709,224 v1(709,243)
NetC5_2: C5.2 U2.4 | length 87.2
  1:Top Layer w6: C5.2 556.66,369.46 564,376.8 U2.4 U2.4@603.25,378
NetC40_1: C40.1 R2.1 X1.3 | length 190.1
  1:Top Layer w7.87: X1.3 1096.52,2757.52 1102,2763 1102,2789 1107.46,2794.46 R2.1 C40.1
NetC41_1: C41.1 R3.1 X1.1 | length 184.6
  1:Top Layer w7.87: R3.1 C41.1 920.54,2876.54 928,2884 928,2909 934,2915 X1.1
NetC52_1: C52.1 U19.106 | length 204.6
  1:Top Layer w8: C52.1 721.46,2716 727.93,2709.54 754.39,2709.54 759.37,2704.56 U19.106
NetC53_1: C53.1 U19.71 | length 95.2
  1:Top Layer w8: U19.71 1576.43,2513.11 C53.1@1577.54,2512
NetLD1_1: LD1.1 R9.1 | length 80.4
  1:Top Layer w6: R9.1 1384,242.54 LD1.1
NetLD1_2: LD1.2 R10.1 R12.1 U20.3 | length 439
  1:Top Layer w6: R10.1 1321.54,169 LD1.2 1321.54,317.54 ; 1321.54,326.86 1326.2,322.2 ; R12.1 1329,494 1321.54,486.54 1321.54,317.54 ; U20.3 1326.2,322.2 ; 1321.54,317.54 1326.2,322.2
NetLD2_1: LD2.1 R17.1 | length 59.5
  1:Top Layer w6: R17.1 LD2.1
NetLD2_2: LD2.2 T1.3 | length 377.3
  1:Top Layer w6: v1@600.1,190.59 v1(603,187.69) LD2.2 ; T1.3 v1(830,192.68)
  4:Bottom Layer w6: v1(603,187.69) 623.85,187.69 627.54,191.37 627.54,192 v1@830.32,192
NetR11_1: R11.1 R13.2 U20.4 | length 158.7
  1:Top Layer w10: U20.4 1581.34,322.2 R13.2 1584.54,264 R11.1
NetR18_1: R18.1 R19.1 T1.1 | length 877.9
  1:Top Layer w6: v1(682,243) 682,162 695.1,148.9 T1.1 695.1,62.9 R19.1@702,56 ; v1(1185,250.6) 1237.07,250.6 1247.46,261 R18.1
  4:Bottom Layer w6: v1(682,243) 682,284 690,292 1163,292 1185,270 v1(1185,250.6)
NRST: ICSP.5 JTAG.10 R5.1 U19.25 | length 2536
  1:Top Layer w6: v1(1146,1680) 1185.54,1680 R5.1 1192,1769.56 U19.25
  1:Top Layer w8: JTAG.10 v1(349,2123)
  4:Bottom Layer w6: 368,1680 v1(1146,1680) ; 1096,1679 1102,1673 ; 1108,1679 1102,1673 ; ICSP.5 1904,1634 1898,1628 1106,1628 1102,1632 1102,1673
  4:Bottom Layer w8: v1(349,2123) 358,2114 358,1690 368,1680
OTG_FS_ID: CN1.4 U19.102 | length 5202.7
  1:Top Layer w8: U19.102 838.11,3014.89 825,3028 62,3028 47.31,3013.31 47.31,307 58.05,296.27 464.1,296.27 473,305.17 473,400.97 490.03,418 901.25,418 913,406.25 913,273 924.06,261.94 997.06,261.94 1010.25,248.75 CN1.4
OTG_FS_N: R14.1 U19.103 U21.4 | length 5197.4
  1:Top Layer w6: U19.103 818.43,2639.14 814.58,2642.98 814.58,3005.97 804.55,3016 81.03,3016 59.31,2994.29 59.31,326.71 77.76,308.27 445.97,308.27 461,323.3 461,462 476,477 1084.43,477 1090.8,470.63 1090.8,454 ; U21.4 1090.8,454 ; 1090.8,440 1097.8,447 ; R14.1 1097.8,447 ; 1090.8,454 1097.8,447
OTG_FS_OVERCURRENT: R12.2 U19.28 | length 1648.8
  1:Top Layer w6: 1251.5,1615 1251.5,1600.5 1287.5,1564.5 1513.5,1564.5 1521,1557
  1:Top Layer w8: 1251.5,1615 U19.28 ; R12.2 1533,494 1553,514 1553,1481.62 1527.62,1507 1527,1507 1527,1551 1521,1557
OTG_FS_P: R15.1 U19.104 U21.5 | length 5159.8
  1:Top Layer w6: U19.104 798.74,2639.14 802.58,2642.98 802.58,3001 799.58,3004 86,3004 71.31,2989.31 71.31,331.69 82.73,320.27 441,320.27 449,328.27 449,466.97 486.03,504 v1@1050,504 ; U21.5 v1(1053.4,447) ; v1(1053.4,504) 1167.54,504 R15.1
  4:Bottom Layer w6: v1(1053.4,447) v1(1053.4,504)
OTG_FS_POWERSWITCHON: R13.1 U19.29 | length 1773
  1:Top Layer w8: U19.29 1271.18,1599.82 1294.5,1576.5 1520.8,1576.5 1540,1557.3 1540,1513 1566,1487 1566,562 1580.3,547.7 1634.84,547.7 1651.46,531.07 R13.1
OTG_FS_VBUS: C56.1 CN1.1 R18.2 SB2.2 U19.101 U20.1 U21.1 | length 6399.5
  1:Top Layer w6: U19.101 857.8,3027.11 844.91,3040 56,3040 35.31,3019.31 35.31,288.69 40.67,283.33 477.33,283.33 485,291 485,396 495,406 882.97,406 890,398.97 v1(890,352) ; C56.1 945,357.28 v1(945,307) U21.1 1018,305 v1(1018,262.84) ; CN1.1 1087.43,232.57 v1(1082,238) 1093.4,238 1122,266.6 1122,290 1133,301 R18.2 ; U20.1 1391,399 v1(1391,430) 1543,430 1549,436 1549,457.72 1556,464.72 SB2.2
  4:Bottom Layer w6: v1(890,352) 890,313.27 896.27,307 v1(945,307) 1377.8,307 1391,320.2 v1(1391,430) ; v1(1018,262.84) 1018,231.28 1023.53,225.75 1055.75,225.75 1068,238 v1(1082,238)
PA0: U19.34
PA1: U19.35
PA2: U19.36
PA3: U19.37
PA4: U19.40 | length 4.1
  1:Top Layer w6: U19.40 U19.40@1485.71,1899.96
PA5: ICSP.3 U19.41 | length 431.7
  1:Top Layer w6: U19.41 1529.59,1922.56 1531.03,1924 1555.12,1924 v1(1556.09,1924.97)
  4:Bottom Layer w6: v1(1556.09,1924.97) 1823.97,1924.97 1847,1948 ICSP.3
PA6: ICSP.1 U19.42 | length 513.9
  1:Top Layer w6: U19.42 1546.82,1942.24 v1@1554.58,1950
  4:Bottom Layer w6: v1(1556.09,1949.99) 1729.99,1949.99 1735,1955 1735,2041 1742,2048 ICSP.1
PA7: ICSP.4 U19.43 | length 759
  1:Top Layer w6: U19.43 1541.51,1961.93 v1@1554.58,1975
  4:Bottom Layer w6: v1(1556.09,1975) 1708.39,1975 1715,1981.61 1715,2093 1722,2100 1944,2100 1956,2088 1956,1996 ICSP.4
PA8: U19.100
PB0: U19.46
PB1: U19.47
PB2: U1.6 U3.6 U4.6 U5.6 U6.6 U7.6 U8.6 U9.6 U10.6 U11.6 U12.6 U13.6 U14.6 U15.6 U16.6 U17.6 U18.6 U19.48 | length 9642.7
  1:Top Layer w6: U15.6 462.5,699 470,706.5 ; U11.6 462.5,945.33 470,952.83 ; U7.6 462.5,1191.67 470,1199.17 ; U3.6 463,1438 470,1431 470,1199.17 ; 463,699.5 470,692.5 ; 463,945.83 470,938.83 ; 463,1192.17 470,1185.17 ; U12.6 v1(955.73,945.33) ; U8.6 v1@954.67,1191.67 ; U4.6 886.33,1435 v1(958,1435) ; v1(960,636) 960,689.25 950.25,699 U16.6 819,699 812,692 812,568 800,556 v1(529,556) 481,556 470,567 470,692.5 ; U13.6 1451.33,945.33 1458.33,938.33 1458.33,923.67 1464,918 1531,918 ; U9.6 1529.33,1191.67 ; U5.6 1451,1438 1456,1433 1456,1405 1460,1401 1529,1401 1536,1394 1536,1185 ; v1(1426,542) 1325,542 1319.3,547.7 1319.3,625.3 1319.3,689.3 1329,699 U17.6 1453,699 1458.33,693.67 1458.33,660.7 1463.97,655.07 1530.07,655.07 1536,661 1536,913 ; 1536,1198.33 1529.33,1191.67 ; v1(1823,2139.09) 1823,1451 1836,1438 U6.6 1968,1438 1976,1430 v1(1976,1413) ; U18.6 1975.5,699 v1(1984,690.5) ; U14.6 v1(1973.33,945.33) ; U10.6 1976.33,1191.67 1982,1186 v1(1982,1154) ; 470,692.5 470,706.5 ; 470,706.5 470,1185.17 ; 470,1185.17 470,1199.17 ; 1529.33,1191.67 1536,1185 ; 1531,918 1536,923 ; 1531,918 1536,913 ; 1536,913 1536,923 ; 1536,923 1536,1185
  1:Top Layer w8: U19.48 1551.65,2060.35 v1(1552,2060) ; U1.6 1639,2843 1653,2829 1653,2753 1660,2746 1692,2746 1699.04,2738.96 v1(1699.04,2594.04)
  4:Bottom Layer w6: v1(529,556) 1266,556 1282,540 1426,540 v1(1426,542) 1469,542 1478,551 1478,623 1491,636 1952.5,636 1958,641.5 1958,695 ; 930,938.67 936.67,945.33 ; 930.5,1186.17 936.33,1192 ; 930.5,1197.83 936.33,1192 ; v1(955,1192) 936.33,1192 ; v1(955.73,945.33) 936.67,945.33 ; v1(958,1435) 936,1435 930,1429 930,952 ; v1(960,636) 934,636 930,640 930,952 ; 1699.04,2134.19 1703.94,2139.09 ; 1699.04,2144 1703.94,2139.09 ; v1(1823,2139.09) 1703.94,2139.09 ; 1958,686 1962.5,690.5 ; 1958.33,940.67 1963,945.33 ; v1(1973.33,945.33) 1962.67,945.33 1958,950 ; v1(1976,1413) 1963,1413 1958,1408 1958,1158 ; v1(1982,1154) 1962,1154 ; v1(1984,690.5) 1962.5,690.5 ; 930,952 936.67,945.33 ; 1958,695 1962.5,690.5 ; 1958,695 1958,950 ; 1958,950 1958,1150 ; 1958,1150 1958,1158 ; 1958,1150 1962,1154 ; 1958,1158 1962,1154
  4:Bottom Layer w8: v1(1552,2060) 1694,2060 1699.04,2065.04 1699.04,2144 v1(1699.04,2594.04)
PB4: U19.134
PB5: U19.135
PB6: R1.1 U1.1 U19.136 | length 2657.7
  1:Top Layer w6: R1.1 353.46,2040.54 332,2062 100.35,2062 91,2071.35 91,2688 98,2695 546,2695 554.96,2703.96 554.96,2934.96 559.96,2939.96 v1(765,2939.96) ; v1(1217,2942) 1290,2942 1291,2941 U1.1
  1:Top Layer w8: R1.1 450.46,2040.54 459,2032 459,2011.5 470.5,2000 644.88,2000 U19.136
  4:Bottom Layer w6: v1(765,2939.96) 1214.96,2939.96 v1(1217,2942)
PB7: U19.137
PB8: U19.139
PB9: U19.140
PB10: U19.69
PB11: U19.70
PB12: U19.73
PB13: U19.74
PB14: U19.75
PB15: U19.76
PC0: U19.26
PC1: U19.27
PC4: U19.44
PC5: U19.45
PC6: U19.96
PC7: U19.97
PC8: U19.98
PC9: U19.99
PC10: U19.111
PC11: U19.112
PC12: U19.113
PC13: U19.7
PC14: U19.8
PC15: U19.9
PD0: U19.114
PD1: U19.115
PD2: U19.116
PD3: U19.117
PD4: U19.118
PD5: U19.119
PD6: U19.122
PD7: U19.123
PD8: U19.77
PD9: U19.78
PD10: U19.79
PD11: U1.5 U19.80 | length 590.3
  1:Top Layer w8: U19.80 1271.18,2646.18 1281,2656 1622,2656 1632,2666 1632,2784 1623,2793 U1.5
PD12: U1.2 U19.81 | length 398.2
  1:Top Layer w6: U19.81 1251.5,2790.5 1243,2799 1220,2799 1211,2808 1211,2885 1219,2893 U1.2 U1.2@1290,2890
PD13: U1.7 U19.82 | length 819.6
  1:Top Layer w8: U19.82 1231.81,2652.72 1200.62,2683.91 1200.62,2738.62 1209,2747 v1(1232,2747) ; U1.7 1573.96,2891.04 v1(1653,2891.04)
  4:Bottom Layer w8: v1(1232,2747) 1641,2747 1653,2759 v1(1653,2891.04)
PD14: R2.2 U19.85 | length 151.5
  1:Top Layer w6: R2.2 1137,2675 1141,2671 1168,2671 1172.76,2666.24 U19.85
PD15: R3.2 U19.86 | length 356.9
  1:Top Layer w8: R3.2 893,2692 901,2684 1048,2684 1073,2659 1145,2659 1153.07,2650.93 U19.86
PDR_ON: R7.2 R8.1 U19.143 | length 198.2
  1:Top Layer w8: R7.2 560,1906.57 R8.1 592.24,1907 599,1900.24 599,1870.01 605.5,1863.5 U19.143
PE0: U19.141
PE1: U19.142
PE2: U1.3 U19.1 | length 1624.5
  1:Top Layer w8: U19.1 720,1858.5 731.5,1870 v1(757.39,1870) ; v1@1240,2843 U1.3
  4:Bottom Layer w8: v1(757.39,1870) 781,1870 789,1878 789,2826.51 804.49,2842 v1(1240,2842)
PE3: U19.2
PE4: U19.3
PE5: U19.4
PE6: U19.5
PE7: U3.5 U4.5 U5.5 U6.5 U7.5 U8.5 U9.5 U10.5 U11.5 U12.5 U13.5 U14.5 U15.5 U16.5 U17.5 U18.5 U19.58 | length 7998.1
  1:Top Layer w6: U15.5 434,649 442.17,640.83 v1(442.17,585.23) ; U11.5 v1(441,895.33) ; U7.5 v1(441,1141.67) ; U3.5 437,1388 442.17,1382.83 v1(442.17,1363) ; v1(610,1332) 632,1332 637,1337 v1(666,1337) ; v1(818,1338) 818,1381 825,1388 U4.5 950.55,1388 958,1380.55 v1(958,1363) ; U16.5 933.25,649 940,642.25 940,593 946,587 v1(962.25,587) ; U12.5 886,898 v1(954.33,898) ; U8.5 v1(954.39,1141.67) ; v1(1123.7,1336) v1(1186,1336) ; U17.5 1338.96,649 1333,643.04 1333,587.3 1337.3,583 v1(1458,583) ; U13.5 v1(1458.33,895.33) ; U9.5 1454.33,1141.67 v1(1457,1139) ; U5.5 1453,1388 1459,1382 v1(1459,1363) ; U19.58 v1(1731.8,2257.2) ; v1(1616,1363) 1616,1342 1624,1334 v1(1691,1334) ; v1(1808,2218) 1808,1396 ; v1@1809,1339 v1(1813,1339) 1813,1361.5 1808,1366.5 1808,1380 ; U18.5 1989,649 2003,663 2003,903 ; U14.5 1995.33,895.33 ; U10.5 1953.33,1141.67 1965,1130 1998,1130 ; U6.5 1816,1388 ; v1(1927,1337) v1(2003,1337) 2003,1135 ; 2003,887.67 1995.33,895.33 ; 2003,1125 1998,1130 ; 1808,1380 1816,1388 ; 1808,1380 1808,1396 ; 1808,1396 1816,1388 ; 1995.33,895.33 2003,903 ; 1998,1130 2003,1135 ; 2003,903 2003,1135
  4:Bottom Layer w6: v1(442.17,585.23) v1(442.17,1363) 536,1363 544,1355 544,1337 549,1332 v1(610,1332) ; v1(666,1337) 817,1337 v1(818,1338) 818,1472 826,1480 1059,1480 1068.56,1470.44 1068.56,1347.44 1080,1336 v1(1123.7,1336) ; v1(954.33,898) 976,898 ; v1(954.39,1141.67) 975.67,1141.67 ; v1(958,1363) 975,1363 981,1357 981,1147 ; v1(962.25,587) 974.91,587 981,593.09 981,903 ; 981,893 976,898 ; 981,1136.33 975.67,1141.67 ; v1(1186,1336) 1452,1336 ; v1@1459,583 1459,1329 ; v1(1616,1363) v1(1459,1363) 1459,1343 ; v1(1691,1334) 1692,1333 1698,1339 v1(1813,1339) 1815,1337 v1(1927,1337) ; v1(1731.8,2257.2) 1797.8,2257.2 1808,2247 v1(1808,2218) ; 975.67,1141.67 981,1147 ; 976,898 981,903 ; 981,903 981,1147 ; 1452,1336 1459,1343 ; 1452,1336 1459,1329 ; 1459,1329 1459,1343
PE8: U3.2 U4.2 U5.2 U6.2 U7.2 U8.2 U9.2 U10.2 U11.2 U12.2 U13.2 U14.2 U15.2 U16.2 U17.2 U18.2 U19.59 | length 7710.2
  1:Top Layer w6: v1(112.9,993) 185.67,993 U11.2 ; v1(113,747) 186,747 U15.2 ; v1(113,1242) 113.33,1241.67 U7.2 ; v1(123,1488) U3.2 ; v1(594,746) U16.2@694.33,746 ; v1(606.37,995.33) U12.2 ; v1(608,1241.67) U8.2 ; v1@614.34,1488 U4.2 ; v1(1106,745) 1202.67,745 U17.2 ; v1(1107.1,1488) U5.2 ; v1(1108.67,995.33) U13.2 ; v1(1111,1241.67) U9.2 ; U19.59 1759.11,2276.89 1780,2256 1780,1496 1772,1488 U6.2 1714,1486 v1(1632,1486) ; v1(1632,749) U18.2 ; v1(1632.33,995.33) U14.2 ; v1(1632.67,1241.67) U10.2
  4:Bottom Layer w6: v1(113,747) 112.9,747.1 v1(112.9,993) 113,993.1 v1(113,1242) 113,1300.31 103.31,1310 103.31,1481.31 110,1488 v1(123,1488) 123,1557 129,1563 538,1563 548,1553 548,1493.5 553.6,1487.9 v1(614.24,1487.9) ; v1(594,746) 635,746 641,752 641,1001 ; v1(606.37,995.33) 635.33,995.33 641,1001 ; v1(608,1241.67) 634.67,1241.67 ; 634.67,996 640.33,990.33 ; 641,1235.33 634.67,1241.67 ; v1(1106,745) 1146,745 1152.46,751.46 1152.46,1002 ; v1(1108.67,995.33) 1145.79,995.33 ; v1(1111,1241.67) 1146.13,1241.67 ; 1113.2,1559 1107.1,1552.9 ; 1152.46,988.67 1145.79,995.33 ; 1152.46,1235.33 1146.13,1241.67 ; v1(1632,749) v1(1632,1486) 1632,1547 1620,1559 1101,1559 ; v1(614.24,1487.9) 614.24,1549.24 624,1559 1101,1559 ; v1(614.24,1487.9) 632.1,1487.9 641,1479 641,1248 ; 634.67,1241.67 641,1248 ; 641,1001 641,1248 ; 1101,1559 1107.1,1552.9 ; 1107.1,1552.9 v1(1107.1,1488) 1145,1488 1152.46,1480.54 1152.46,1248 ; 1145.79,995.33 1152.46,1002 ; 1146.13,1241.67 1152.46,1248 ; 1152.46,1002 1152.46,1248
PE9: U3.3 U4.3 U5.3 U6.3 U7.3 U8.3 U9.3 U10.3 U11.3 U12.3 U13.3 U14.3 U15.3 U16.3 U17.3 U18.3 U19.60 | length 7588.3
  1:Top Layer w6: U15.3 245,699 253,707 v1(253,1583) ; U11.3 246.33,945.33 ; U7.3 246,1191.67 ; U3.3 246.33,1438 ; 252,1185.67 246,1191.67 ; 252,1197.67 246,1191.67 ; 252.33,939.33 246.33,945.33 ; 252.33,951.33 246.33,945.33 ; 252.33,1432 246.33,1438 ; 252.33,1444 246.33,1438 ; v1(548,1413) v1(548,1583) ; v1(611.39,1439) 612.39,1438 U4.3 773,1438 781,1430 781,1199 ; U16.3 772,699 781,708 781,952 ; U12.3 774.33,945.33 ; U8.3 773.67,1191.67 ; 781,938.67 774.33,945.33 ; 781,1184.33 773.67,1191.67 ; U17.3 1257.33,699 1263,704.67 1263,952 ; U13.3 1256.33,945.33 ; U9.3 1256.67,1191.67 ; U5.3 1257,1438 ; v1(1226.04,1583) 1252,1583 1263,1572 1263,1444 ; 1262.67,939 1256.33,945.33 ; 1263,1432 1257,1438 ; U19.60 1768.43,2296.57 1792,2273 1792,1200 ; v1(1654,1437) 1715,1437 U6.3 1786,1438 1791,1433 ; U18.3 1783,699 1792,708 1792,900.33 1792,951 ; U14.3 1786.33,945.33 ; U10.3 1783.67,1191.67 ; 1786,1439 1791,1444 ; 1792,939.67 1786.33,945.33 ; 1792,1183.33 1783.67,1191.67 ; 773.67,1191.67 781,1199 ; 774.33,945.33 781,952 ; 781,952 781,1199 ; 1256.33,945.33 1263,952 ; 1256.67,1191.67 1263,1198 ; 1256.67,1191.67 1263,1185.33 ; 1257,1438 1263,1444 ; 1263,952 1263,1185.33 ; 1263,1185.33 1263,1198 ; 1263,1198 1263,1444 ; 1783.67,1191.67 1792,1200 ; 1786.33,945.33 1792,951 ; 1792,951 1792,1200
  4:Bottom Layer w6: v1(253,1583) v1(548,1583) 1642,1583 1654,1571 v1(1654,1437) ; v1(548,1413) 574,1439 v1(611.39,1439)
PE10: U3.7 U4.7 U5.7 U6.7 U7.7 U8.7 U9.7 U10.7 U11.7 U12.7 U13.7 U14.7 U15.7 U16.7 U17.7 U18.7 U19.63 | length 8106.6
  1:Top Layer w6: 291,743 296.67,748.67 ; 291,755 296.67,749.33 ; 291,990.33 296.33,995.67 291,1001 ; 291.33,1236 297,1241.67 U7.7 ; 296.67,995.33 U11.7 ; 296.67,1242 291,1247.67 ; 297,749 U15.7 ; U3.7 295.93,1488 291,1483.07 291,1247.67 ; 798.74,989.67 804.41,995.33 ; 798.74,1234.33 806.07,1241.67 ; U16.7 809,749 798.74,759.26 798.74,1001 ; U8.7 806.07,1241.67 ; U4.7 805,1488 798.74,1481.74 798.74,1249 ; 981.33,995.33 U12.7 804.41,995.33 ; 989,989 982,996 989,1003 ; v1@1028,1095.9 v1(1027.04,1095.9) 1001.9,1095.9 989,1083 989,1003 ; v1(1114.9,1095.9) v1(1191.48,1095.9) v1@1192.44,1095.9 ; 1315.04,989.67 1320.71,995.33 ; v1(1316,1096) 1478.9,1096 v1@1479,1095.9 ; U17.7 1324.3,749 1315.04,758.26 1315.04,1001 ; U13.7 1320.71,995.33 ; U9.7 1321.37,1241.67 ; U5.7 1328,1488 1315.04,1475.04 1315.04,1248 ; U19.63 1821.37,2355.63 1844,2333 1844,1497.5 1853.5,1488 U6.7 1992,1488 2000,1480 2000,1367 1993,1360 1852,1360 1840,1348 1840,1236.5 ; v1(1608.04,1095) v1(1730.1,1095) ; 1840.67,989.33 1847.33,996 ; U18.7 1848,749 1840,757 1840,1002 ; U14.7 1846.67,995.33 1840,1002 ; U10.7 1845.17,1241.67 1840,1236.5 ; 291,1247.67 291,623 302,612 397,612 403,606 403,542 408,537 979,537 989,547 989,1003 ; 798.74,1001 804.41,995.33 ; 798.74,1001 798.74,1249 ; 798.74,1249 806.07,1241.67 ; 1315.04,1001 1320.71,995.33 ; 1315.04,1001 1315.04,1235.33 ; 1315.04,1235.33 1321.37,1241.67 ; 1315.04,1235.33 1315.04,1248 ; 1315.04,1248 1321.37,1241.67 ; 1840,1002 v1(1840,1097) 1840,1236.5
  4:Bottom Layer w6: v1(1027.04,1095.9) v1(1114.9,1095.9) v1@1115.86,1095.9 ; v1(1191.48,1095.9) 1191.58,1096 v1(1316,1096) ; v1(1480.04,1095) v1(1608.04,1095) v1@1609,1095 ; v1(1730.1,1095) v1@1840,1095
PE11: U19.64
PE12: U19.65
PE13: U19.66
PE14: U19.67
PE15: U19.68
PG0: U19.56
PG2: U19.87
PG3: U19.88
PG4: U19.89
PG5: U19.90
PG7: U19.92
PG8: U19.93
PG9: U19.124
PG10: U19.125
PG11: U19.126
PG12: U19.127
PG13: U19.128
PG14: U19.129
PG15: U19.132
PH0: U19.23
PH1: U19.24
USB_FS1_N: CN1.2 R14.2 U21.2 | length 424.9
  1:Top Layer w6: CN1.2 1061.84,268.16 1053.4,276.6 U21.2 1053.4,350.4 1064,361 1129,361 1136,368 1136,395 1145,404 1222,404 1237.46,419.46 R14.2
USB_FS1_P: CN1.3 R15.2 U21.3 | length 591
  1:Top Layer w6: CN1.3 v1(1036.25,240.75) ; v1(1090.8,262.37) U21.3 1090.8,335.8 1099,344 1272,344 1285,357 1285,491 1275,501 R15.2
  4:Bottom Layer w6: v1(1036.25,240.75) 1036.25,257.16 1041.46,262.37 v1(1090.8,262.37)
VDDA: C36.1 C39.1 C54.1 C55.1 L1.1 U19.32 U19.33 | length 420.9
  1:Top Layer w8: U19.32@1330,1769.76 U19.32 1330.24,1732.24 1320,1722 C55.1 C36.1 ; U19.33 1349.92,1735.08 1377,1708 C36.1 ; L1.1@1548,1681.46 1491,1681.46 C54.1 C36.1
pads on no net: U19.57 U19.91

## Polygon pours and split planes (outlines as drawn)
GND on 4:Bottom Layer "TOP_GND" (solid, remove dead copper, pour order 5): 0,3070.87 2086.61,3070.87 2086.61,0 0,0 0,3070.87
GND on 1:Top Layer "TOP_GND" (solid, remove dead copper, pour order 1): 0,3070.87 2086.61,3070.87 2086.61,0 0,0 0,3070.87
GND on 3:GND (split plane): 2066.52,20.1 20.1,20.1 20.1,3050.77 2066.52,3050.77
5V on 2:Power (split plane): 1301.94,513.73 1301.94,296.27 1283.73,278.06 670,278.06 668.83,277.83 667.84,277.16 647.84,257.16 647.17,256.17 646.94,255 646.94,101.27 618.73,73.06 248.06,73.06 248.06,238.73 271.27,261.94 415,261.94 416.17,262.17 417.16,262.84 447.16,292.84 447.83,293.83 448.06,295 448.06,468.73 506.27,526.94 1288.73,526.94
3V3 on 2:Power (split plane): 2066.52,20.1 20.1,20.1 20.1,3050.77 2066.52,3050.77

## Keep-outs
Keep-Out Layer:
  lines w0: 0,0 2086.61,0 2086.61,3070.87 0,3070.87 0,0
  lines w7.87: 0,0 2086.61,0 2086.61,3070.87 0,3070.87 0,0

## Other copper
2:Power (plane layer: these items are gaps in the copper):
  lines w6: 245,70 620,70 650,100 650,255 670,275 1285,275 1305,295 1305,515 1290,530 505,530 445,470 445,295 415,265 270,265 245,240 245,70

## Silkscreen, mask and mechanical layers (free items; w line width, h text height)
Top Overlay:
  lines w6: 1281,1597 1281,1589 1288,1582 1585.54,1582 1589,1585.46 1589,1599 ; 1568,1582 1568,1573 1573,1568 1697,1568 1711,1582 1711,1637 ; 1711,1637 1705,1631 1717,1631 1711,1637
Mechanical 1:
  drawing of 295 lines, arcs and shapes, not listed
  text "Layer" at 2212.5,1540.5 h60
  text "Name" at 2622.41,1540.5 h60
  text "Material" at 3552.16,1540.5 h60
  text "Thickness" at 4411.92,1540.5 h60
  text "Constant" at 5061.76,1540.5 h60
  text "Board Layer Stack" at 5631.62,1540.5 h60
  text "1" at 2212.5,1420.5 h60
  text "Top Overlay" at 2622.41,1420.5 h60
  text "2" at 2212.5,1300.5 h60
  text "Top Solder" at 2622.41,1300.5 h60
  text "Solder Resist" at 3552.16,1300.5 h60
  text "0.40mil" at 4411.92,1300.5 h60
  text "3.5" at 5061.76,1300.5 h60
  text "3" at 2212.5,1180.5 h60
  text "1:Top Layer" at 2622.41,1180.5 h60
  text "Copper" at 3552.16,1180.5 h60
  text "1.42mil" at 4411.92,1180.5 h60
  text "4" at 2212.5,1060.5 h60
  text "Dielectric 1" at 2622.41,1060.5 h60
  text "FR-4" at 3552.16,1060.5 h60
  text "18.90mil" at 4411.92,1060.5 h60
  text "4.2" at 5061.76,1060.5 h60
  text "5" at 2212.5,940.5 h60
  text "2:Power" at 2622.41,940.5 h60
  text "Copper" at 3552.16,940.5 h60
  text "1.42mil" at 4411.92,940.5 h60
  text "6" at 2212.5,820.5 h60
  text "Dielectric 2" at 2622.41,820.5 h60
  text "FR-4" at 3552.16,820.5 h60
  text "18.90mil" at 4411.92,820.5 h60
  text "4.2" at 5061.76,820.5 h60
  text "7" at 2212.5,700.5 h60
  text "3:GND" at 2622.41,700.5 h60
  text "Copper" at 3552.16,700.5 h60
  text "1.42mil" at 4411.92,700.5 h60
  text "8" at 2212.5,580.5 h60
  text "Dielectric 3" at 2622.41,580.5 h60
  text "FR-4" at 3552.16,580.5 h60
  text "18.90mil" at 4411.92,580.5 h60
  text "4.2" at 5061.76,580.5 h60
  text "9" at 2212.5,460.5 h60
  text "4:Bottom Layer" at 2622.41,460.5 h60
  text "Copper" at 3552.16,460.5 h60
  text "1.42mil" at 4411.92,460.5 h60
  text "10" at 2212.5,340.5 h60
  text "Bottom Solder" at 2622.41,340.5 h60
  text "Solder Resist" at 3552.16,340.5 h60
  text "0.40mil" at 4411.92,340.5 h60
  text "3.5" at 5061.76,340.5 h60
  text "11" at 2212.5,220.5 h60
  text "Bottom Overlay" at 2622.41,220.5 h60
Board Outline:
  the board outline again, w10
Stack Table:
  text "Total Thickness = 1.6mm" at 2247,-28.99 h60

## Dimensions
275.59,472.44 to 0,0 on Board Outline
275.59,2874.02 to 0,3070.87 on Board Outline
275.59,2874.02 to 0,3070.87 on Board Outline
275.59,472.44 to 0,0 on Board Outline
0,0 to 2086.61,0 on Board Outline
0,0 to 0,3070.87 on Board Outline